# Altium PCB Kasli-DIOT.PCBDOC (part 4 of 23)
Units mm, origin at the board's own origin, x right, y up, seen from the top; angles counter-clockwise.
Board outline 222.9 x 100 mm, 10 copper layers (TopLayer, Layer 2, Layer 3, Layer 4, Layer 5, Layer 6, Layer 7, layer 8, Layer 9, BottomLayer), stack 1.564 mm thick; 977 components, 900 nets, 4676 pads, 2725 vias.
Unrouted connection lines stored in the file: 17.
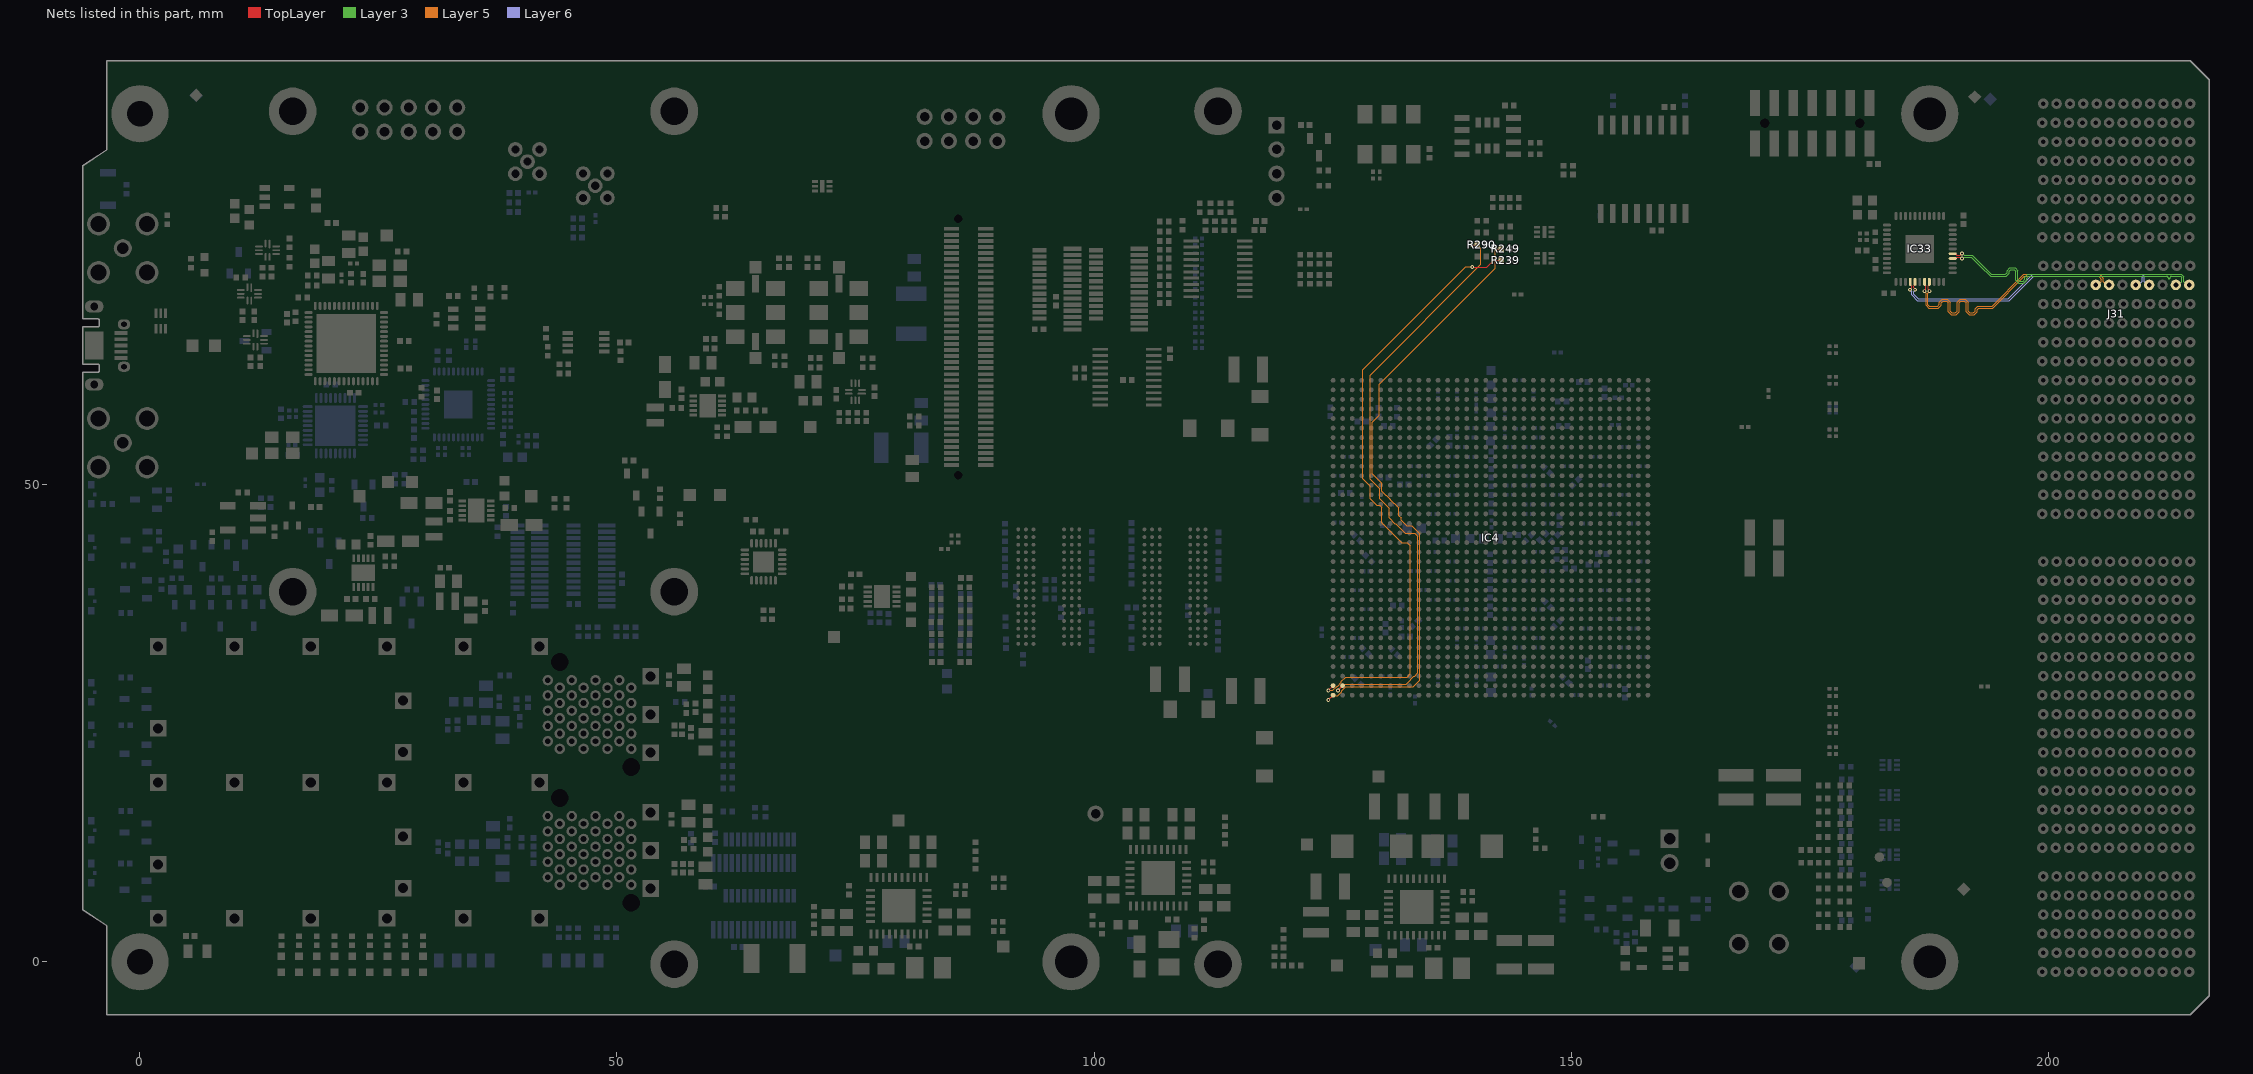
[diagram p12: the nets of this part, all layers, seen from the top]

## Footprints (in the part's own frame and the unit in brackets; to place one, negate y for a bottom-side part, rotate by r counter-clockwise, add the part's x,y. Pads: shape width x height; smd on the part's side, far side on the other; paste and mask are expansions set on the pad) (continued)
QFN50P600X600X90-37N-S425 [mm] "QFN, 0.50mm Pitch, Square; 36 Pin, 6.00mm L X 6.00mm W X 0.90mm H Body (w/thermal tab 4.25m x 4.25mm), IPC Medium Density"
  oval 1.05x0.3 smd: 1(-2.9,2) 2(-2.9,1.5) 3(-2.9,1) 4(-2.9,0.5) 5(-2.9,0) 6(-2.9,-0.5) 7(-2.9,-1) 8(-2.9,-1.5) 9(-2.9,-2) 19(2.9,-2) 20(2.9,-1.5) 21(2.9,-1) 22(2.9,-0.5) 23(2.9,0) 24(2.9,0.5) 25(2.9,1) 26(2.9,1.5) 27(2.9,2)
  oval 0.3x1.05 smd: 10(-2,-2.9) 11(-1.5,-2.9) 12(-1,-2.9) 13(-0.5,-2.9) 14(0,-2.9) 15(0.5,-2.9) 16(1,-2.9) 17(1.5,-2.9) 18(2,-2.9) 28(2,2.9) 29(1.5,2.9) 30(1,2.9) 31(0.5,2.9) 32(0,2.9) 33(-0.5,2.9) 34(-1,2.9) 35(-1.5,2.9) 36(-2,2.9)
  rect 4.25x4.25 smd: 37(0,0)
  silkscreen extent -4.01,-3 3,3, body extent -3,-3 3,3, height 0.9
QFN50P700X700X90-45N-S295 [mm] "QFN, 0.50mm Pitch, Square; 44 pin, 7.00mm L X 7.00mm W X 0.90mm H Body (w/Thermal Tab 2.95mm X 2.95mm), IPC Medium Density"
  oval 0.85x0.3 smd: 1(-3.45,2.5) 2(-3.45,2) 3(-3.45,1.5) 4(-3.45,1) 5(-3.45,0.5) 6(-3.45,0) 7(-3.45,-0.5) 8(-3.45,-1) 9(-3.45,-1.5) 10(-3.45,-2) 11(-3.45,-2.5) 23(3.45,-2.5) 24(3.45,-2) 25(3.45,-1.5) 26(3.45,-1) 27(3.45,-0.5) 28(3.45,0) 29(3.45,0.5) 30(3.45,1) 31(3.45,1.5) 32(3.45,2) 33(3.45,2.5)
  oval 0.3x0.85 smd: 12(-2.5,-3.45) 13(-2,-3.45) 14(-1.5,-3.45) 15(-1,-3.45) 16(-0.5,-3.45) 17(0,-3.45) 18(0.5,-3.45) 19(1,-3.45) 20(1.5,-3.45) 21(2,-3.45) 22(2.5,-3.45) 34(2.5,3.45) 35(2,3.45) 36(1.5,3.45) 37(1,3.45) 38(0.5,3.45) 39(0,3.45) 40(-0.5,3.45) 41(-1,3.45) 42(-1.5,3.45) 43(-2,3.45) 44(-2.5,3.45)
  rect 2.95x2.95 smd: 45(0,0)
  silkscreen extent -4.57,-3.5 3.5,3.5, body extent -3.5,-3.5 3.5,3.5, height 0.9
QFN50P800X800X100-57N-S620 [mm] "QFN, 0.50mm Pitch, Square; 56 Pin, 8.00mm L X 8.00mm W X 1.00mm H body (6.1mm X 6.1mm Thermal tab), IPC Medium Density"
  oval 0.85x0.3 smd: 1(-3.95,3.25) 2(-3.95,2.75) 3(-3.95,2.25) 4(-3.95,1.75) 5(-3.95,1.25) 6(-3.95,0.75) 7(-3.95,0.25) 8(-3.95,-0.25) 9(-3.95,-0.75) 10(-3.95,-1.25) 11(-3.95,-1.75) 12(-3.95,-2.25) 13(-3.95,-2.75) 14(-3.95,-3.25) 29(3.95,-3.25) 30(3.95,-2.75) 31(3.95,-2.25) 32(3.95,-1.75) 33(3.95,-1.25) 34(3.95,-0.75) 35(3.95,-0.25) 36(3.95,0.25) 37(3.95,0.75) 38(3.95,1.25) 39(3.95,1.75) 40(3.95,2.25) 41(3.95,2.75) 42(3.95,3.25)
  oval 0.3x0.85 smd: 15(-3.25,-3.95) 16(-2.75,-3.95) 17(-2.25,-3.95) 18(-1.75,-3.95) 19(-1.25,-3.95) 20(-0.75,-3.95) 21(-0.25,-3.95) 22(0.25,-3.95) 23(0.75,-3.95) 24(1.25,-3.95) 25(1.75,-3.95) 26(2.25,-3.95) 27(2.75,-3.95) 28(3.25,-3.95) 43(3.25,3.95) 44(2.75,3.95) 45(2.25,3.95) 46(1.75,3.95) 47(1.25,3.95) 48(0.75,3.95) 49(0.25,3.95) 50(-0.25,3.95) 51(-0.75,3.95) 52(-1.25,3.95) 53(-1.75,3.95) 54(-2.25,3.95) 55(-2.75,3.95) 56(-3.25,3.95)
  rect 6.2x6.2 smd: 57(0,0)
  silkscreen extent -5.07,-4 4,4, body extent -4,-4 4,4, height 1
RESC0603X28N [mm] "Chip Resistor, EIA 0201, Metric 0603, Body 0.6 x 0.3mm, IPC Medium Density"
  rect 0.46x0.42 smd: 1(-0.33,0) 2(0.33,0)
  body extent -0.32,-0.17 0.33,0.18, height 0.28
RESC1005X40N [mm] "Chip Resistor, EIA 0402, Metric 1005, Body 1.0x0.5mm, IPC Medium Density"
  rect 0.58x0.62 smd: 1(-0.47,0) 2(0.47,0)
  body extent -0.52,-0.27 0.53,0.28, height 0.4
RESC1608X55N [mm] "Chip Resistor, EIA 0603, Metric 1608, Body 1.6x0.8mm, IPC Medium Density"
  rect 0.9x1 smd: 1(-0.8,0) 2(0.8,0)
  body extent -0.87,-0.47 0.88,0.48, height 0.55
RESC2012X60N [mm] "Chip Resistor, EIA 0805, Metric 2012, Body 2.0x1.2mm, IPC Medium Density"
  rect 0.95x1.4 smd: 1(-1,0) 2(1,0)
  silkscreen extent 0,-0.55 0,0.55, body extent -1.1,-0.67 1.1,0.68, height 0.6
RESC2113X55N [mm] "Chip Resistor, EIA 0805, Metric 2113, Body 2.05x1.3mm, IPC Medium Density"
  rect 1x1.45 smd: 1(-0.95,0) 2(0.95,0)
  silkscreen extent 0,-0.55 0,0.55, body extent -1,-0.62 1,0.63, height 0.55
SAMTEC_HTSW-104-23-L-S [mm] "4 Contacts - Pitch 2.54mm - Single Row Through Mount Straigh Header (Post Lead 5.84mm, Tail Lead 2.92mm, Insulator 2.54mm)"
  rect 1.7x1.7 hole 1: 1(0,0)
  round 1.7 hole 1: 2(2.54,0) 3(5.08,0) 4(7.62,0)
  silkscreen extent -1.27,-1.27 8.89,2.01, body extent -1.27,-1.27 8.89,1.27, height 8.38
SAMTEC_LSS-140-01-L-DV-A [mm] "80 Contacts, Pitch 0.635mm, Razor Beam LSS Vertical High Speed Hermaphroditic Strip (Lead Style 4.5mm)"
  rect 0.4x1.6 smd: 1(12.383,-1.8) 2(12.383,1.8) 3(11.747,-1.8) 4(11.747,1.8) 5(11.112,-1.8) 6(11.112,1.8) 7(10.477,-1.8) 8(10.477,1.8) 9(9.842,-1.8) 10(9.842,1.8) 11(9.207,-1.8) 12(9.207,1.8) 13(8.572,-1.8) 14(8.572,1.8) 15(7.938,-1.8) 16(7.938,1.8) 17(7.302,-1.8) 18(7.302,1.8) 19(6.667,-1.8) 20(6.667,1.8) 21(6.032,-1.8) 22(6.032,1.8) 23(5.397,-1.8) 24(5.397,1.8) 25(4.763,-1.8) 26(4.763,1.8) 27(4.127,-1.8) 28(4.127,1.8) 29(3.492,-1.8) 30(3.492,1.8) 31(2.857,-1.8) 32(2.857,1.8) 33(2.222,-1.8) 34(2.222,1.8) 35(1.588,-1.8) 36(1.587,1.8) 37(0.953,-1.8) 38(0.952,1.8) 39(0.318,-1.8) 40(0.317,1.8) 41(-0.317,-1.8) 42(-0.318,1.8) 43(-0.952,-1.8) 44(-0.953,1.8) 45(-1.587,-1.8) 46(-1.588,1.8) 47(-2.222,-1.8) 48(-2.222,1.8) 49(-2.857,-1.8) 50(-2.857,1.8) 51(-3.492,-1.8) 52(-3.492,1.8) 53(-4.127,-1.8) 54(-4.127,1.8) 55(-4.763,-1.8) 56(-4.763,1.8) 57(-5.397,-1.8) 58(-5.397,1.8) 59(-6.032,-1.8) 60(-6.032,1.8) 61(-6.667,-1.8) 62(-6.667,1.8) 63(-7.302,-1.8) 64(-7.302,1.8) 65(-7.938,-1.8) 66(-7.938,1.8) 67(-8.572,-1.8) 68(-8.572,1.8) 69(-9.207,-1.8) 70(-9.207,1.8) 71(-9.842,-1.8) 72(-9.842,1.8) 73(-10.477,-1.8) 74(-10.477,1.8) 75(-11.112,-1.8) 76(-11.112,1.8) 77(-11.747,-1.8) 78(-11.747,1.8) 79(-12.383,-1.8) 80(-12.383,1.8)
  round 0.5 hole 0.9 unplated mask+0.2: P1(-13.45,1.1) P2(13.45,1.1)
  silkscreen extent -15.07,-2.83 15.07,2.14, body extent -15.07,-2.3 15.08,2.3, height 4.5
SAMTEC_MMCX-J-P-H-ST-TH1 [mm] "Straight Through-hole 50 Ohm Micro Mini RF Jack, MMCX Serie"
  round 1.55 hole 0.85: 1(0,0) 2(-1.27,1.27) 2(-1.27,-1.27) 2(1.27,1.27) 2(1.27,-1.27)
  silkscreen extent -1.75,-1.75 1.75,1.75, body extent -1.75,-1.75 1.75,1.75, height 4.35
SAMTEC_TSM-102-01-L-DV [mm] "2 Contacts, Pitch 2.54mm, Dual Row Surface Mount Straight Header (Post Lead 5.84mm)"
  rect 1.27x3.68 smd: 1(-1.27,-2.475) 2(-1.27,2.475) 3(1.27,-2.475) 4(1.27,2.475)
  silkscreen extent -2.54,-5.17 2.54,1.87, body extent -2.54,-3.85 2.54,3.85, height 9.65
SAMTEC_TSW-105-07-L-D-LL [mm] "10 Contacts, Pitch 2.54mm - Dual Row, Through Mount Straigh Header"
  round 1.7 hole 1: 1(-5.08,-1.27) 2(-5.08,1.27) 3(-2.54,-1.27) 4(-2.54,1.27) 5(0,-1.27) 6(0,1.27) 7(2.54,-1.27) 8(2.54,1.27) 9(5.08,-1.27) 10(5.08,1.27)
  silkscreen extent -6.35,-3.28 6.35,2.54, body extent -6.35,-2.54 6.35,2.54, height 8.38
SOD2512X110N [mm] "Small Outline Diode (SOD-323), 1.70mm W X 1.25mm L X 1.10mm H body,  IPC Medium Density"
  rect 0.9x0.5 smd: 1(-1.3,0) 2(1.3,0)
  silkscreen extent -1.62,-0.65 0.85,0.87, body extent -1.35,-0.67 1.35,0.68, height 1.1
SOIC127P600X175-8N [mm] "SOIC 8, Pitch 1.27mm - Body 4x5mm, IPC Medium Density"
  rect 1.55x0.6 smd: 1(-2.7,1.905) 2(-2.7,0.635) 3(-2.7,-0.635) 4(-2.7,-1.905) 5(2.7,-1.905) 6(2.7,-0.635) 7(2.7,0.635) 8(2.7,1.905)
  silkscreen extent -3.6,-2.5 1.55,2.87, body extent -3.1,-2.5 3.1,2.5, height 1.75
SOIC127P1030X265-16N [mm] "SOIC 16, Pitch 1.27mm - Body 7.5x10.3mm, IPC Medium Density"
  rect 2x0.6 smd: 1(-4.65,4.445) 2(-4.65,3.175) 3(-4.65,1.905) 4(-4.65,0.635) 5(-4.65,-0.635) 6(-4.65,-1.905) 7(-4.65,-3.175) 8(-4.65,-4.445) 9(4.65,-4.445) 10(4.65,-3.175) 11(4.65,-1.905) 12(4.65,-0.635) 13(4.65,0.635) 14(4.65,1.905) 15(4.65,3.175) 16(4.65,4.445)
  silkscreen extent -5.52,-5.15 3.32,5.38, body extent -5.18,-5.25 5.18,5.25, height 1.68
SON50P160X65_HS-7N [mm] "SON, 6-Leads, Body 1,60x1,60mm, Pitch 0,50mm, Thermal Pad 1,18x0,28mm, IPC Medium Density"
  rect 0.63x0.3 smd: 1(-0.76,0.5) 2(-0.76,0) 3(-0.76,-0.5) 4(0.76,-0.5) 5(0.76,0) 6(0.76,0.5)
  rect 0.45x1.3 smd: 7(0,0)
  silkscreen extent -1.27,-0.98 0.85,1.02, body extent -0.85,-0.85 0.85,0.85, height 0.65
SON50P300X300X80-11N-R175X248 [mm] "SON, 0.50mm Pitch, 10-pin, 3.00mm W  X 3.00mm L X 0.80mm Height, (w/thermal tab 1.75 X 2.48 mm), IPC Medium Density"
  rect 0.8x0.3 smd: 1(-1.5,1) 2(-1.5,0.5) 3(-1.5,0) 4(-1.5,-0.5) 5(-1.5,-1) 6(1.5,-1) 7(1.5,-0.5) 8(1.5,0) 9(1.5,0.5) 10(1.5,1)
  rect 1.75x2.48 smd: 11(0,0)
  silkscreen extent -1.67,1.63 -1.42,1.87, body extent -1.5,-1.5 1.5,1.5, height 0.8
SOP65P400X130-8N [mm] "SOP, 0.65mm, Pitch; 8 Pin, 2.80mm W X 2.95mm L X 1.30mm H Body, PC Medium Density"
  rect 1.1x0.4 smd: 1(-1.9,0.975) 2(-1.9,0.325) 3(-1.9,-0.325) 4(-1.9,-0.975) 5(1.9,-0.975) 6(1.9,-0.325) 7(1.9,0.325) 8(1.9,0.975)
  silkscreen extent -2.33,-1.5 1.02,1.82, body extent -2.15,-1.57 2.15,1.58, height 1.3
SOP65P640X110-24N [mm] "SOP, 24-Leads, Body 7.9x4.5mm (max), Pitch 0.65mm, IPC Medium Density"
  rect 1.45x0.45 smd: 1(-2.95,3.575) 2(-2.95,2.925) 3(-2.95,2.275) 4(-2.95,1.625) 5(-2.95,0.975) 6(-2.95,0.325) 7(-2.95,-0.325) 8(-2.95,-0.975) 9(-2.95,-1.625) 10(-2.95,-2.275) 11(-2.95,-2.925) 12(-2.95,-3.575) 13(2.95,-3.575) 14(2.95,-2.925) 15(2.95,-2.275) 16(2.95,-1.625) 17(2.95,-0.975) 18(2.95,-0.325) 19(2.95,0.325) 20(2.95,0.975) 21(2.95,1.625) 22(2.95,2.275) 23(2.95,2.925) 24(2.95,3.575)
  silkscreen extent -1.85,-4.18 1.85,3.95, body extent -3.12,-3.95 3.12,3.95, height 1.1
SOP65P780X200-28N [mm] "SOP, 0.65mm Pitch; 28 Pin, 5.30mm W X 10.20mm L X 2.00mm H Body, IPC Medium Density"
  rect 1.85x0.45 smd: 1(-3.5,4.225) 2(-3.5,3.575) 3(-3.5,2.925) 4(-3.5,2.275) 5(-3.5,1.625) 6(-3.5,0.975) 7(-3.5,0.325) 8(-3.5,-0.325) 9(-3.5,-0.975) 10(-3.5,-1.625) 11(-3.5,-2.275) 12(-3.5,-2.925) 13(-3.5,-3.575) 14(-3.5,-4.225) 15(3.5,-4.225) 16(3.5,-3.575) 17(3.5,-2.925) 18(3.5,-2.275) 19(3.5,-1.625) 20(3.5,-0.975) 21(3.5,-0.325) 22(3.5,0.325) 23(3.5,0.975) 24(3.5,1.625) 25(3.5,2.275) 26(3.5,2.925) 27(3.5,3.575) 28(3.5,4.225)
  silkscreen extent -4.27,-5.45 2.25,5.1, body extent -4.11,-5.25 4.11,5.25, height 2
SOT65P210X110-3N [mm] "SOT323, 0.65mm pitch; 3 pin, 1.25mm W X 2.00mm L, IPC Medium Density"
  rect 0.85x0.55 smd: 1(-1.05,0.65) 2(-1.05,-0.65) 3(1.05,0)
  silkscreen extent -0.3,-1 0.3,1, body extent -1.1,-1.1 1.1,1.1, height 1.1
SOT95P230X110-3N [mm] "SOT23, 3 pin, Pitch 0.95mm - 1.3mm W X 2.9mm L X 1.1mm H, IPC Medium Density"
  rect 1x0.6 smd: 1(-1.15,0.95) 2(-1.15,-0.95) 3(1.15,0)
  silkscreen extent -1.52,-1.45 0.33,1.87, body extent -1.08,-1.5 1.25,1.5, height 1.1
SOT95P240X110-3N [mm] "SOT23 3-Leads, Pitch 0.95mm, Body 1.3x2.9mm, IPC Medium Density"
  rect 1.05x0.65 smd: 1(-1.15,0.95) 2(-1.15,-0.95) 3(1.15,0)
  silkscreen extent -1.53,-1.45 0.3,1.92, body extent -1.25,-1.5 1.25,1.5, height 1.1
SOT95P270X145-6N [mm] "SOT, 0.95mm Pitch; 6 Pin,1.55mm W X 2.90mm L X 1.45mm H body, IPC Medium Density"
  rect 1.1x0.6 smd: 1(-1.4,0.95) 2(-1.4,0) 3(-1.4,-0.95) 4(1.4,-0.95) 5(1.4,0) 6(1.4,0.95)
  silkscreen extent -1.82,-1.45 0.45,1.71, body extent -1.35,-1.45 1.35,1.45, height 1.45
SOT95P280X100-5N [mm] "SOT23, 0.95mm pitch; 5 pin, 1.625mm W X 2.9mm L, IPC Medium Density"
  rect 1.1x0.55 smd: 1(-1.35,0.95) 2(-1.35,0) 3(-1.35,-0.95) 4(1.35,-0.95) 5(1.35,0.95)
  silkscreen extent -1.78,-1.45 0.48,1.87, body extent -1.4,-1.5 1.4,1.5, height 1
SOT95P280X145-5N [mm] "SOT, 0.95mm pitch; 5 pin, 1.60mm W X 2.90mm L X 1.45mm H body, IPC Medium Density"
  rect 1.1x0.6 smd: 1(-1.3,0.95) 2(-1.3,0) 3(-1.3,-0.95) 4(1.3,-0.95) 5(1.3,0.95)
  silkscreen extent -1.72,-1.45 0.43,1.87, body extent -1.4,-1.5 1.4,1.5, height 1.45
SOT95P280X145-6N [mm] "SOT23, 6-Leads, Body 1.6x3.0mm, Pitch 0.95mm, IPC Medium Density"
  rect 1.05x0.6 smd: 1(-1.35,0.95) 2(-1.35,0) 3(-1.35,-0.95) 4(1.35,-0.95) 5(1.35,0) 6(1.35,0.95)
  silkscreen extent -2.45,-1.55 0.45,1.55, body extent -1.4,-1.5 1.4,1.5, height 1.45
SOT-23-TT3_L [mm] "SOT23, 3-Leads, Body 2.9x1.3mm, Pitch 0.95mm, Lead Span 2.4mm, IPC High Density"
  rect 1.2x0.6 smd: 1(-0.9,0.95) 2(-0.9,-0.95) 3(0.9,0)
  silkscreen extent -1.02,-1.55 0.7,1.93, body extent -0.7,-1.52 0.7,1.53, height 1.12
SW_OMRON_B3U-3000PM [mm] "Body 3.2x4.0mm, SPST Surface-Mounting Tactile Switch with Side Actuator (B3U Series)"
  rect 0.8x1.7 smd: 1(-1.7,0) 2(1.7,0)
  silkscreen extent -2.82,-1.57 1.5,1.22, body extent -2,-1.95 2,1.25, height 1.2
"TEXAS_DRC (S-PVSON-N10)" [mm] "SON, TEXAS DRC (S-PVSON-N10), 0.50mm Pitch, 10-pin, 3.00mm W  X 3.00mm L X 1.00mm Height, (w/thermal tab 1.65 X 2.40 mm)"
  rect 0.85x0.3 smd: 1(-1.5,1) 2(-1.5,0.5) 3(-1.5,0) 4(-1.5,-0.5) 5(-1.5,-1) 6(1.5,-1) 7(1.5,-0.5) 8(1.5,0) 9(1.5,0.5) 10(1.5,1)
  rect 1.65x2.4 smd: 11(0,0)
  TopLayer region: -0.825,1.2 -0.39,1.2 -0.39,1.9 -0.11,1.9 -0.11,1.2 0.11,1.2 0.11,1.9 0.39,1.9 0.39,1.2 0.825,1.2 0.825,-1.2 0.39,-1.2 0.39,-1.9 0.11,-1.9 0.11,-1.2 -0.11,-1.2 -0.11,-1.9 -0.39,-1.9 -0.39,-1.2 -0.825,-1.2
  body extent -1.57,-1.57 1.58,1.58, height 1
TPS127 [mm] "1.27 x  1.27mm SMD Test Point Area"
  rect 1.27x1.27 smd paste-1.27: 1(0,0)
  silkscreen extent -0.94,-0.94 0.94,0.94
USBLC6-2P6 [mm]
  rect 0.3x0.99 smd: 1(-0.5,-0.78) 2(0,-0.78) 3(0.5,-0.78) 4(0.5,0.83) 5(0,0.83) 6(-0.5,0.83)
  silkscreen extent -0.6,-1.62 -0.5,-1.53, body extent -0.75,-0.72 0.75,0.78, height 0.46
XFMR_MINI-CIRCUITS_AT1521 [mm] "MINI-CIRCUITS RF Transformer, Case AT1521, Body 3.81X3.81mm"
  rect 0.76x1.65 smd: 1(-1.27,1.59) 2(0,1.59) 3(1.27,1.59) 4(1.27,-1.59) 6(-1.27,-1.59)
  silkscreen extent -2.3,-0.37 1.91,1.72, body extent -1.9,-1.9 1.91,1.91, height 4.06
XTAL_CONNOR_CS [mm] "4 Pins, 2.5x3.2mm, SMD Sealing Crystal, CS Serie"
  rect 1.2x1.4 smd: 1(-0.85,1.1) 2(-0.85,-1.1) 3(0.85,-1.1) 4(0.85,1.1)
  silkscreen extent -2.12,1.08 -1.88,1.33, body extent -1.25,-1.6 1.25,1.6, height 0.8
XTAL_TXC_7M [mm] "4 Pins, 2.5x3.2mm, SMD Sealing Crystal, 7M Serie"
  rect 1.2x1.4 smd: 1(-0.85,1.1) 2(-0.85,-1.1) 3(0.85,-1.1) 4(0.85,1.1)
  silkscreen extent -1.62,2.18 -1.37,2.43, body extent -1.25,-1.6 1.25,1.6, height 0.8

## Part data
B28 B29: library part SMD_PAD_D1MM, "Through Hole Pad", Author="CERN DEM JLC", Component Type="Standard (No BOM)", ComponentHeight=0mm, CreateDate=10.10.2017, Family="SMD Pad", HelpURL=Undefined, LatestRevisionDate=10.10.2017, Mounted=No, PackageDescription="1mm Diameter SMD Pad", Part Description="1mm Diameter SMD Pad", Part Number=SMD_PAD_D1MM, Pin Count=1, Sense=No, SMD=No, Socket=No, Status=None
C1 C2 C4 C5 C6 C7 C8 C10 C11 C14 C20 C21 C25 C26 C41 C51 C54 C63 C70 C71 C72 C73 C74 C77 C100 C112 C113 C114 C115 C116 C120 C122 C141 C142 C157 C159 C188 C189 C200 C201 C203 C210 C212 C228 C229 C230 C231 C232 C233 C236 C237 C245 C246 C247 C258 C295 C297 C300 C323 C324 C325 C326 C327 C334 C335 C336 C337 C338 C341 C342 C343 C344 C345 C354 C392 C393 C394 C395 C399 C400 C401 C402 C403 C405 C410 C411 C413 C414 C415 C416 C417 C418 C421 C422 C434 C435 C436 C437 C438 C439 C440 C441 C442 C443 C444 C445 C446 C447 C448 C449 C450 C479: library part CC0201_100NF_6.3V_10%_X5R, "Non-polarised capacitor", Case=0201, Manufacturer=GENERIC, Manufacturer1 ComponentHeight=0.33mm, Manufacturer1 Example=AVX, Manufacturer1 Part Number=02016D104KAT2A, Tolerance=±10%, Voltage=6.3V, Author="CERN DEM JLC", Component Type=Standard, HelpURL=\\cern.ch\dfs\Applications\Altium\Datasheets\CC0201_X5R_AVX.pdf, Manufacturer Part Number=CC0201_100NF_6.3V_10%_X5R, Mounted=Yes, Part Description="SMD Multilayer Chip Ceramic Capacitor", Part Number=CC0201_100NF_6.3V_10%_X5R, Pin Count=2, Sense=No, SMD=Yes, Socket=No, Status="Not Recommended", TC=X5R
  C1 C2 C4 C6 C7 C8 C10 C11 C20 C21 C25 C26 C41 C54 C77 C100 C141 C157 C188 C189 C200 C201 C203 C228 C236 C237 C245 C246 C247 C295 C297 C300 C392 C393 C394 C395 C403 C405 C413 C414 C415 C416 C417 C418 C422: CreateDate=2007-12-03, LatestRevisionDate=2007-12-03
  C5 C14 C63 C70 C71 C72 C73 C74 C142 C210 C212 C229 C230 C231 C232 C233 C258 C399 C400 C401 C402 C410 C411 C421 C434 C435 C436 C437 C438 C439 C440 C441 C442 C443 C444 C445 C446 C447 C448 C449 C450 C479: CreateDate=03.12.2007, LatestRevisionDate=03.12.2007
  C51 C112 C113 C114 C115 C116 C120 C122 C323 C324 C325 C326 C327 C334 C335 C336 C337 C338 C341 C342 C343 C344 C345 C354: ClassName=Artix, CreateDate=2007-12-03, LatestRevisionDate=2007-12-03
  C159: ClassName=FPGA_JTAG, CreateDate=2007-12-03, LatestRevisionDate=2007-12-03
C3 C18 C22 C27 C40 C42 C48 C130 C131 C132 C133 C137 C144 C194 C195 C299 C301 C302 C303 C304 C381 C383 C384 C385 C386 C387 C388 C389 C390 C423 C424 C425: library part CC0805_22UF_16V_10%_X5R, "Non-polarised capacitor", Case=0805, Manufacturer=GENERIC, Manufacturer1 ComponentHeight=1.35mm, Manufacturer1 Example=TDK, Manufacturer1 Part Number=C2012X5R1C226KT, Tolerance=±10%, Voltage=16V, Author="CERN DEM JLC", Component Type=Standard, CreateDate=25.10.2012, HelpURL=\\cern.ch\dfs\Applications\Altium\Datasheets\CC0805_X5R_TDK_C.pdf, LatestRevisionDate=25.10.2012, Manufacturer Part Number=CC0805_22UF_16V_10%_X5R, Mounted=Yes, Part Description="SMD Multilayer Chip Ceramic Capacitor", Part Number=CC0805_22UF_16V_10%_X5R, Pin Count=2, Sense=No, SMD=Yes, Socket=No, Status=Preferred, TC=X5R
C9 C13 C19 C45 C225 C286: library part CTE3216-18_22UF_6.3V_10%_LESR0900, "Polarised capacitor", Case=A, Manufacturer=GENERIC, Manufacturer1 ComponentHeight=1.8mm, Manufacturer1 Example=AVX, Manufacturer1 Part Number=TPSA226K006R0900, Tolerance=±10%, Voltage=6.3V, Author="CERN DEM JLC", Component Type=Standard, CreateDate=05.05.2008, HelpURL=\\cern.ch\dfs\Applications\Altium\Datasheets\CTE-LESR_AVX_TPS.pdf, LatestRevisionDate=20.01.2009, Manufacturer Part Number=CTE3216-18_22UF_6.3V_10%_LESR0900, Mounted=Yes, Part Description="Low ESR 0R9 Solid Tantalum Chip Capacitor", Part Number=CTE3216-18_22UF_6.3V_10%_LESR0900, Pin Count=2, Sense=No, SMD=Yes, Socket=No, Status=Preferred
C12 C15 C170 C278 C292 C454 C471 C472 C473: library part CC0402_4.7UF_6.3V_20%_X5R, "Non-polarised capacitor", Case=0402, Manufacturer=GENERIC, Manufacturer1 ComponentHeight=0.65mm, Manufacturer1 Example=TDK, Manufacturer1 Part Number=C1005X5R0J475M050BC, Tolerance=±20%, Voltage=6.3V, Author="CERN DEM JLC", Component Type=Standard, HelpURL=\\cern.ch\dfs\Applications\Altium\Datasheets\CC0402_X5R_TDK_C.pdf, Manufacturer Part Number=CC0402_4.7UF_6.3V_20%_X5R, Mounted=Yes, Part Description="SMD Multilayer Chip Ceramic Capacitor", Part Number=CC0402_4.7UF_6.3V_20%_X5R, Pin Count=2, Sense=No, SMD=Yes, Socket=No, Status=Preferred, TC=X5R
  C12 C15 C278: CreateDate=03.03.2015, LatestRevisionDate=03.03.2015
  C170 C292 C454 C471 C472 C473: CreateDate=03/03/2015, LatestRevisionDate=03/03/2015
C16 C17 C279: library part CC0603_22UF_6.3V_20%_X5R, "Non-polarised capacitor", Case=0603, Manufacturer=GENERIC, Manufacturer1 ComponentHeight=1mm, Manufacturer1 Example=TDK, Manufacturer1 Part Number=C1608X5R0J226M080, Tolerance=±20%, Voltage=6.3V, Author="CERN DEM JLC", Component Type=Standard, CreateDate=16.12.2013, HelpURL=\\cern.ch\dfs\Applications\Altium\Datasheets\CC0603_X5R_TDK_C.pdf, LatestRevisionDate=13.09.2016, Manufacturer Part Number=CC0603_22UF_6.3V_20%_X5R, Mounted=Yes, Part Description="SMD Multilayer Chip Ceramic Capacitor", Part Number=CC0603_22UF_6.3V_20%_X5R, Pin Count=2, Sense=No, SMD=Yes, Socket=No, Status=None, TC=X5R
C23 C226 C287 C290 C291: library part CC0402_1NF_50V_10%_X7R, "Non-polarised capacitor", Case=0402, Manufacturer=GENERIC, Manufacturer1 ComponentHeight=0.55mm, Manufacturer1 Example=PHYCOMP, Manufacturer1 Part Number=223858715623, Tolerance=±10%, Voltage=50V, Author="CERN DEM JLC", Component Type=Standard, CreateDate=03.12.2007, HelpURL=\\cern.ch\dfs\Applications\Altium\Datasheets\CC0402_X7R_PHYCOMP.pdf, LatestRevisionDate=03.12.2007, Manufacturer Part Number=CC0402_1NF_50V_10%_X7R, Mounted=Yes, Part Description="SMD Multilayer Chip Ceramic Capacitor", Part Number=CC0402_1NF_50V_10%_X7R, Pin Count=2, Sense=No, SMD=Yes, Socket=No, Status="Not Recommended", TC=X7R
C24 C172 C178 C180 C190 C244 C259 C261 C267 C269 C275: library part CC0402_1UF_16V_10%_X5R, "Non-polarised capacitor", Case=0402, Manufacturer=GENERIC, Manufacturer1 ComponentHeight=0.55mm, Manufacturer1 Example=TDK, Manufacturer1 Part Number=C1005X5R1C105KT, Tolerance=±10%, Voltage=16V, Author="CERN DEM JLC", Component Type=Standard, HelpURL=\\cern.ch\dfs\Applications\Altium\Datasheets\CC0402_X5R_TDK_C.pdf, Manufacturer Part Number=CC0402_1UF_16V_10%_X5R, Mounted=Yes, Part Description="SMD Multilayer Chip Ceramic Capacitor", Part Number=CC0402_1UF_16V_10%_X5R, Pin Count=2, Sense=No, SMD=Yes, Socket=No, Status=Preferred, TC=X5R
  C24 C178 C180 C190 C244 C259 C261 C267 C269 C275: CreateDate=2012-10-25, LatestRevisionDate=2012-10-25
  C172: CreateDate=25.10.2012, LatestRevisionDate=25.10.2012
C28 C29 C36 C38 C49 C52 C53 C160 C161 C162 C163 C168 C169 C177 C181 C182 C183 C185 C186 C191 C192 C193 C196 C197 C198 C199 C204 C213 C214 C215 C216 C217 C218 C219 C220 C221 C222 C223 C224 C227 C234 C239 C241 C262 C263 C265 C266 C270 C271 C273 C276 C277 C281 C293 C296 C298 C305 C306 C366 C367 C397 C404 C407 C408 C409 C412 C427 C452 C453 C457 C458 C461 C467 C474 C475 C476 C477 C478: library part CC0402_100NF_16V_10%_X7R, "Non-polarised capacitor", Case=0402, Manufacturer=GENERIC, Manufacturer1 ComponentHeight=0.55mm, Manufacturer1 Example=MURATA, Manufacturer1 Part Number=GRM155R71C104KA88D, Tolerance=±10%, Voltage=16V, Author="CERN DEM JLC", Component Type=Standard, CreateDate=05/12/2013, HelpURL=\\cern.ch\dfs\Applications\Altium\Datasheets\CC0402_X7R_MURATA_GRM.pdf, LatestRevisionDate=03/12/2007, Manufacturer Part Number=CC0402_100NF_16V_10%_X7R, Mounted=Yes, Part Description="SMD Multilayer Chip Ceramic Capacitor", Part Number=CC0402_100NF_16V_10%_X7R, Pin Count=2, Sense=No, SMD=Yes, Socket=No, Status="Not Recommended", TC=X7R
C30 C362 C363: library part CTE3528-21_33UF_16V_10%, "Polarised capacitor", Case=B, Manufacturer=GENERIC, Manufacturer1 ComponentHeight=2.1mm, Manufacturer1 Example=AVX, Manufacturer1 Part Number=TAJB336K016R, Tolerance=±10%, Voltage=16V, Author="CERN DEM JLC", Component Type=Standard, CreateDate=03.12.2007, HelpURL=\\cern.ch\dfs\Applications\Altium\Datasheets\CTE_AVX_TAJ.pdf, LatestRevisionDate=03.12.2007, Manufacturer Part Number=CTE3528-21_33UF_16V_10%, Mounted=Yes, Part Description="Solid Tantalum Chip Capacitor", Part Number=CTE3528-21_33UF_16V_10%, Pin Count=2, Sense=No, SMD=Yes, Socket=No, Status=Preferred
C31 C33 C34 C35 C37 C39 C57 C58 C59 C66 C67 C78 C79 C85 C86 C92 C93 C94 C96 C109 C110 C111 C123 C124 C134 C135 C143 C145 C151 C152 C158 C240 C313 C314 C352 C355 C356 C357 C358 C361 C428 C429 C480 C481: library part CC0402_4.7UF_6.3V_20%_X5R, "Non-polarised capacitor", Case=0402, Manufacturer=GENERIC, Manufacturer1 ComponentHeight=0.65mm, Manufacturer1 Example=TDK, Manufacturer1 Part Number=C1005X5R0J475M050, Tolerance=±20%, Voltage=6.3V, Author="CERN DEM JLC", Component Type=Standard, CreateDate=03.03.2015, HelpURL=\\cern.ch\dfs\Applications\Altium\Datasheets\CC0402_X5R_TDK_C.pdf, LatestRevisionDate=03.03.2015, Manufacturer Part Number=CC0402_4.7UF_6.3V_20%_X5R, Mounted=Yes, Part Description="SMD Multilayer Chip Ceramic Capacitor", Part Number=CC0402_4.7UF_6.3V_20%_X5R, Pin Count=2, Sense=No, SMD=Yes, Socket=No, Status=Preferred, TC=X5R
C32 C364 C365: library part CTE3216-18_10UF_16V_20%_AVX_TCJ, "Polarised capacitor", Case=A, Manufacturer=AVX, Manufacturer Part Number=TCJA106M016R0200, Tolerance=±20%, Voltage=16V, Author="CERN DEM JLC", Component Type=Standard, ComponentHeight=1.8mm, CreateDate=29.03.2012, HelpURL=\\cern.ch\dfs\Applications\Altium\Datasheets\CTE_AVX_TCJ.pdf, LatestRevisionDate=29.03.2012, Mounted=Yes, Part Description="ESR 0R200 Tantalum Solid Electrolytic Chip Capacitor with Conductive Polymer Electrode", Part Number=CTE3216-18_10UF_16V_20%_AVX_TCJ, Pin Count=2, Sense=No, SMD=Yes, Socket=No, Status=Preferred
C43 C44 C46 C47 C164 C165 C166 C167 C175 C238 C462 C463 C464 C468 C469 C470: library part CC0402_10NF_16V_10%_X7R, "Non-polarised capacitor", Case=0402, Manufacturer=GENERIC, Manufacturer1 ComponentHeight=0.55mm, Manufacturer1 Example=PHYCOMP, Manufacturer1 Part Number=223878715636, Tolerance=±10%, Voltage=16V, Author="CERN DEM JLC", Component Type=Standard, CreateDate=03.12.2007, HelpURL=\\cern.ch\dfs\Applications\Altium\Datasheets\CC0402_X7R_PHYCOMP.pdf, LatestRevisionDate=03.12.2007, Manufacturer Part Number=CC0402_10NF_16V_10%_X7R, Mounted=Yes, Part Description="SMD Multilayer Chip Ceramic Capacitor", Part Number=CC0402_10NF_16V_10%_X7R, Pin Count=2, Sense=No, SMD=Yes, Socket=No, Status="Not Recommended", TC=X7R
C50 C319 C320 C321 C332 C339: library part CC0603_22UF_6.3V_20%_X5R, "Non-polarised capacitor", Case=0603, Manufacturer=GENERIC, Manufacturer1 ComponentHeight=0.9mm, Manufacturer1 Example=TDK, Manufacturer1 Part Number=C1608X5R0J226M080, Tolerance=±20%, Voltage=6.3V, Author="CERN DEM JLC", Component Type=Standard, CreateDate=16.12.2013, HelpURL=\\cern.ch\dfs\Applications\Altium\Datasheets\CC0603_X5R_TDK_C.pdf, LatestRevisionDate=03.12.2020, Manufacturer Part Number=CC0603_22UF_6.3V_20%_X5R, Mounted=Yes, Part Description="SMD Multilayer Chip Ceramic Capacitor", Part Number=CC0603_22UF_6.3V_20%_X5R, Pin Count=2, Sense=No, SMD=Yes, Socket=No, Status=None, TC=X5R
C55 C60 C61 C62 C64 C68 C69 C75 C76 C80 C81 C82 C83 C87 C88 C89 C90 C95 C97 C98 C99 C102 C103 C104 C105 C106 C107 C108 C117 C118 C119 C121 C125 C126 C127 C128 C136 C138 C139 C140 C146 C147 C148 C149 C153 C154 C155 C156 C242 C308 C309 C310 C311 C315 C316 C317 C318 C322 C333 C340 C353 C368 C369 C370 C371 C372 C373 C374 C375 C376 C377 C378 C379 C380 C430 C431 C432 C433 C482 C483 C484 C485: library part CC0201_470NF_4V_20%_X5R, "Non-polarised capacitor", Case=0201, Manufacturer=GENERIC, Manufacturer1 ComponentHeight=0.33mm, Manufacturer1 Example="TAIYO YUDEN", Manufacturer1 Part Number=AMK063BJ474MP-F, Tolerance=±20%, Voltage=4V, Author="CERN DEM JLC", Component Type=Standard, CreateDate=27.05.2010, HelpURL=\\cern.ch\dfs\Applications\Altium\Datasheets\CC0201_X5R_TAIYO-YUDEN_STANDARD-CLASS2.pdf, LatestRevisionDate=27.05.2010, Manufacturer Part Number=CC0201_470NF_4V_20%_X5R, Mounted=Yes, Part Description="SMD Multilayer Chip Ceramic Capacitor", Part Number=CC0201_470NF_4V_20%_X5R, Pin Count=2, Sense=No, SMD=Yes, Socket=No, Status="Not Recommended", TC=X5R
  C61 C69 C81 C88 C95 C97 C98 C99 C126 C138 C147 C154 C309 C316 C322 C333 C340 C353 C370 C376 C431 C483: ClassName=Artix
C56 C65 C84 C129 C150 C312 C351 C359 C360: library part CC1210_100UF_6.3V_20%_X5R, "Non-polarised capacitor", Case=1210, Manufacturer=GENERIC, Manufacturer1 ComponentHeight=2.7mm, Manufacturer1 Example=MURATA, Manufacturer1 Part Number=GRM32ER60J107ME20L, Tolerance=±20%, Voltage=6.3V, Author="CERN DEM JLC", Component Type=Standard, CreateDate=19.04.2010, HelpURL=\\cern.ch\dfs\Applications\Altium\Datasheets\CC1210_X5R_MURATA.pdf, LatestRevisionDate=19.04.2010, Manufacturer Part Number=CC1210_100UF_6.3V_20%_X5R, Mounted=Yes, Part Description="SMD Multilayer Chip Ceramic Capacitor", Part Number=CC1210_100UF_6.3V_20%_X5R, Pin Count=2, Sense=No, SMD=Yes, Socket=No, Status=Preferred, TC=X5R
C91 C346: library part CTE7343-19_330UF_2.5V_20%_LESR0025_KEMET_T520, "Polarised capacitor", Case=V, Manufacturer=KEMET, Manufacturer Part Number=T520V337M2R5ATE025, Tolerance=±20%, Voltage=2.5V, Author="CERN DEM MR", ComponentHeight=1.9mm, Component Type=Standard, CreateDate=23.03.2016, HelpURL=\\cern.ch\dfs\Applications\Altium\Datasheets\CTE-LESR_KEMET_T520.pdf, LatestRevisionDate=23.03.2016, Mounted=Yes, Part Description="Low ESR 0R025 Tantalum Chip Capacitor", Part Number=CTE7343-19_330UF_2.5V_20%_LESR0025_KEMET_T520, Pin Count=2, Sense=No, SMD=Yes, Socket=No, Status=None
C101 C173 C174 C176 C205: library part CC0603_22UF_6.3V_20%_X5R, "Non-polarised capacitor", Case=0603, Manufacturer=GENERIC, Manufacturer1 ComponentHeight=1mm, Manufacturer1 Example=TDK, Manufacturer1 Part Number=C1608X5R0J226M080AC, Tolerance=±20%, Voltage=6.3V, Author="CERN DEM JLC", Component Type=Standard, CreateDate=16.12.2013, HelpURL=\\cern.ch\dfs\Applications\Altium\Datasheets\CC0603_X5R_TDK_C.pdf, LatestRevisionDate=13.09.2016, Manufacturer Part Number=CC0603_22UF_6.3V_20%_X5R, Mounted=Yes, Part Description="SMD Multilayer Chip Ceramic Capacitor", Part Number=CC0603_22UF_6.3V_20%_X5R, Pin Count=2, Sense=No, SMD=Yes, Socket=No, Status=None, TC=X5R
  C101 C205: ClassName=Artix
C171 C451 C455 C456 C459 C460 C465 C466: library part CC0402_470NF_16V_10%_X5R, "Non-polarised capacitor", Case=0402, Manufacturer=GENERIC, Manufacturer1 ComponentHeight=0.55mm, Manufacturer1 Example=TDK, Manufacturer1 Part Number=C1005X5R1C105KT, Tolerance=±10%, Voltage=16V, Author="CERN DEM JLC", Component Type=Standard, CreateDate=10/25/2012, HelpURL=\\cern.ch\dfs\Applications\Altium\Datasheets\CC0402_X5R_TDK_C.pdf, LatestRevisionDate=10/25/2012, Manufacturer Part Number=CC0402_470NF_16V_10%_X5R, Mounted=Yes, Part Description="SMD Multilayer Chip Ceramic Capacitor", Part Number=CC0402_470NF_16V_10%_X5R, Pin Count=2, Sense=No, SMD=Yes, Socket=No, Status=Preferred, TC=X5R
C179 C184 C260 C264 C268 C272 C274 C280: library part CC0805_10UF_25V_10%_X5R, "Non-polarised capacitor", Case=0805, Manufacturer=GENERIC, Manufacturer1 ComponentHeight=0.95mm, Manufacturer1 Example=MURATA, Manufacturer1 Part Number=GRM219R61E106KA12D, Tolerance=±10%, Voltage=25V, Author="CERN DEM JLC", Component Type=Standard, CreateDate=25.10.2012, HelpURL=\\cern.ch\dfs\Applications\Altium\Datasheets\CC0805_X5R_MURATA_GRM.pdf, LatestRevisionDate=06.09.2016, Manufacturer Part Number=CC0805_10UF_25V_10%_X5R, Mounted=Yes, Part Description="SMD Multilayer Chip Ceramic Capacitor", Part Number=CC0805_10UF_25V_10%_X5R, Pin Count=2, Sense=No, SMD=Yes, Socket=No, Status=Preferred, TC=X5R
C187 C382 C391 C406 C419 C420: library part CC0603_1UF_25V_10%_X7R, "Non-polarised capacitor", Case=0603, Manufacturer=GENERIC, Manufacturer1 ComponentHeight=0.9mm, Manufacturer1 Example=MURATA, Manufacturer1 Part Number=GRM188R71E105KA12D, Tolerance=±10%, Voltage=25V, Author="CERN DEM JLC", Component Type=Standard, CreateDate=18.01.2011, HelpURL=\\cern.ch\dfs\Applications\Altium\Datasheets\CC0603_X7R_MURATA.pdf, LatestRevisionDate=18.01.2011, Manufacturer Part Number=CC0603_1UF_25V_10%_X7R, Mounted=Yes, Part Description="SMD Multilayer Chip Ceramic Capacitor", Part Number=CC0603_1UF_25V_10%_X7R, Pin Count=2, Sense=No, SMD=Yes, Socket=No, Status=None, TC=X7R
C202: library part CC0603_10UF_6.3V_20%_X5R, "Non-polarised capacitor", Case=0603, Manufacturer=GENERIC, Manufacturer1 ComponentHeight=0.95mm, Manufacturer1 Example=KEMET, Manufacturer1 Part Number=C0603C106M9PAC, Manufacturer Part Number=CC0603_10uF_6.3V_20%_X5R, Tolerance=±20%, Voltage=6.3V, Author="CERN DEM JLC", Component Type=Standard, CreateDate=2007-12-03, HelpURL=\\cern.ch\dfs\Applications\Altium\Datasheets\CC0603_X5R_KEMET.pdf, LatestRevisionDate=2007-12-03, Mounted=Yes, Part Description="SMD Multilayer Chip Ceramic Capacitor", Part Number=CC0603_10UF_6.3V_20%_X5R, Pin Count=2, Sense=No, SMD=Yes, Socket=No, Status=Preferred, TC=X5R
C206 C209 C211 C288 C289: library part CC0805_4.7UF_10V_10%_X5R, "Non-polarised capacitor", Case=0805, Manufacturer=GENERIC, Manufacturer1 ComponentHeight=1.45mm, Manufacturer1 Example=PHYCOMP, Manufacturer1 Part Number=222224013672, Tolerance=±10%, Voltage=10V, Author="CERN DEM JLC", Component Type=Standard, CreateDate=03.12.2007, HelpURL=\\cern.ch\dfs\Applications\Altium\Datasheets\CC0805_X5R_PHYCOMP_HC.pdf, LatestRevisionDate=03.12.2007, Manufacturer Part Number=CC0805_4.7UF_10V_10%_X5R, Mounted=Yes, Part Description="SMD Multilayer Chip Ceramic Capacitor", Part Number=CC0805_4.7UF_10V_10%_X5R, Pin Count=2, Sense=No, SMD=Yes, Socket=No, Status=Preferred, TC=X5R
C207 C208 C243: library part CC0402_22PF_50V_5%_C0G, "Non-polarised capacitor", Case=0402, Manufacturer=GENERIC, Manufacturer1 ComponentHeight=0.55mm, Manufacturer1 Example=KEMET, Manufacturer1 Part Number=C0402C220J5GACTU, Tolerance=±5%, Voltage=50V, Author="CERN DEM JLC", Component Type=Standard, HelpURL="\\cern.ch\dfs\Applications\Altium\Datasheets\CC0805_C0G_KEMET_(Commercial Grade).pdf", Manufacturer Part Number=CC0402_22PF_50V_5%_C0G, Mounted=Yes, Part Description="SMD Multilayer Chip Ceramic Capacitor", Part Number=CC0402_22PF_50V_5%_C0G, Pin Count=2, Sense=No, SMD=Yes, Socket=No, Status=Preferred, TC=C0G/NP0
  C207 C208: CreateDate=03.12.2007, LatestRevisionDate=03.12.2007
  C243: CreateDate=2007-12-03, LatestRevisionDate=2007-12-03
C235: library part CC1210_47UF_10V_10%_X7R, "Non-polarised capacitor", Case=1210, Manufacturer=GENERIC, Manufacturer1 ComponentHeight=2.7mm, Manufacturer1 Example=MURATA, Manufacturer1 Part Number=GRM32ER71A476KE15, Tolerance=±10%, Voltage=10V, Author="CERN DEM BC", Component Type=Standard, CreateDate=18.11.2015, HelpURL=\\cern.ch\dfs\Applications\Altium\Datasheets\CC1210_X7R_MURATA.pdf, LatestRevisionDate=18.11.2015, Manufacturer Part Number=CC1210_47UF_10V_10%_X7R, Mounted=Yes, Part Description="SMD Multilayer Chip Ceramic Capacitor", Part Number=CC1210_47UF_10V_10%_X7R, Pin Count=2, Sense=No, SMD=Yes, Socket=No, Status=None, TC=X7R
C307: library part CC0402_100NF_16V_10%_X5R, "Non-polarised capacitor", Case=0402, Manufacturer=GENERIC, Manufacturer1 ComponentHeight=0.55mm, Manufacturer1 Example=MURATA, Manufacturer1 Part Number=GRM155R61C104KA88D, Tolerance=±10%, Voltage=16V, Author="CERN DEM JLC", Component Type=Standard, CreateDate=2013-12-10, HelpURL=\\cern.ch\dfs\Applications\Altium\Datasheets\CC0402_X5R_MURATA_GRM.pdf, LatestRevisionDate=2013-12-10, Manufacturer Part Number=CC0402_100NF_16V_10%_X5R, Mounted=Yes, Part Description="SMD Multilayer Chip Ceramic Capacitor", Part Number=CC0402_100NF_16V_10%_X5R, Pin Count=2, Sense=No, SMD=Yes, Socket=No, Status=None, TC=X5R
C328 C329 C330 C331 C347 C348 C349 C350: library part CC0201_22NF_6.3V_10%_X5R, "Non-polarised capacitor", Case=0201, Manufacturer=GENERIC, Manufacturer1 ComponentHeight=0.33mm, Manufacturer1 Example=AVX, Manufacturer1 Part Number=02016D223KAT2A, Tolerance=±10%, Voltage=6.3V, Author="CERN DEM JLC", Component Type=Standard, CreateDate=2007-12-03, HelpURL=\\cern.ch\dfs\Applications\Altium\Datasheets\CC0201_X5R_AVX.pdf, LatestRevisionDate=2007-12-03, Manufacturer Part Number=CC0201_22NF_6.3V_10%_X5R, Mounted=Yes, Part Description="SMD Multilayer Chip Ceramic Capacitor", Part Number=CC0201_22NF_6.3V_10%_X5R, Pin Count=2, SMD=Yes, Socket=No, Status="Not Recommended", Table="Capacitors SMD", TC=X5R
C396: library part CC0402_27PF_50V_5%_C0G, "Non-polarised capacitor", Case=0402, Manufacturer=GENERIC, Manufacturer1 ComponentHeight=0.55mm, Manufacturer1 Example=KEMET, Manufacturer1 Part Number=C0402C270J5GACTU, Tolerance=±5%, Voltage=50V, Author="CERN DEM JLC", Component Type=Standard, CreateDate=25/10/2012, HelpURL="\\cern.ch\dfs\Applications\Altium\Datasheets\CC0402_C0G_KEMET_(Commercial Grade).pdf", LatestRevisionDate=22/04/2015, Manufacturer Part Number=CC0402_27PF_50V_5%_C0G, Mounted=Yes, Part Description="SMD Multilayer Chip Ceramic Capacitor", Part Number=CC0402_27PF_50V_5%_C0G, Pin Count=2, Sense=No, SMD=Yes, Socket=No, Status=Preferred, TC=C0G/NP0
C398: library part CC1206_10UF_25V_10%_X7R, "Non-polarised capacitor", Case=1206, Manufacturer=GENERIC, Manufacturer1 ComponentHeight=1.8mm, Manufacturer1 Example=KEMET, Manufacturer1 Part Number=C1206C106K4RACTU, Tolerance=±10%, Voltage=25V, Author="CERN DEM JLC", Component Type=Standard, CreateDate=12/09/2012, HelpURL=\\cern.ch\dfs\Applications\Altium\Datasheets\CC1206_X7R_KEMET.pdf, LatestRevisionDate=12/09/2012, Manufacturer Part Number=CC1206_10UF_25V_10%_X7R, Mounted=Yes, Part Description="SMD Multilayer Chip Ceramic Capacitor", Part Number=CC1206_10UF_25V_10%_X7R, Pin Count=2, Sense=No, SMD=Yes, Socket=No, Status=Preferred, TC=X7R
D1 D3 D4 D5 D6 D7 D8 D15: library part CMP-004-00037-2, "Diode TVS Quint Common Anode Uni-Dir 3.3V 40W 6-Pin SLP EP T/R", Max Operating Temperature=125°C, Min Operating Temperature=-55°C, Mounting Technology="Surface Mount", Pins=6
D2: library part CMP-004-00042-2, "ESD Suppressors / TVS Diodes High Speed Interface Protection Low Cap", Case/Package=SOT-666, Forward Voltage=1.1V, Max Operating Temperature=125°C, Min Operating Temperature=-40°C, Mounting Technology="Surface Mount", Pins=6
D10: library part BAV99W-7-F, "Serial Diode", Case=SOT323, Manufacturer="DIODES INCORPORATED", Power=200mW, Voltage=75V, Author="CERN DEM MR", Bonding=No, Component Type=Standard, ComponentHeight=1.10mm, CreateDate=10.02.2016, Device=BAV99W, HelpURL=\\cern.ch\dfs\Applications\Altium\Datasheets\BAV99W.pdf, LatestRevisionDate=10.02.2016, Manufacturer Part Number=BAV99W, Mounted=Yes, PackageDescription="SOT323, 0.65mm Pitch; 3 Pin, 1.25mm W X 2.00mm L X 1.10mm H body, IPC Medium Density", Part Description="Dual Surface Mount Switching Diode", Part Number=BAV99W-7-F, Pin Count=3, PressFit=No, Sense=No, SMD=Yes, Socket=No
D17 D18: "Schottky Diode", Case=SOD323, Manufacturer=INFINEON, Power=750mA, Voltage=40V, Author="CERN DEM JLC", Bonding=No, ComponentHeight=1.1mm, Component Type=Standard, CreateDate=12.11.2014, Device=BAT165, HelpURL=\\cern.ch\dfs\Applications\Altium\Datasheets\BAT165.pdf, LatestRevisionDate=12.11.2014, Manufacturer Part Number=BAT165, Mounted=Yes, PackageDescription="Small Outline Diode (SOD-323), 1.70mm W X 1.25mm L X 1.10mm H body,  IPC Medium Density", Part Description="Medium Power AF Schottky Diode", Part Number=BAT165, Pin Count=2, PressFit=No, Sense=No, SMD=Yes, Socket=No
F1 F4: library part FUSR_BOURNS_MF-MSMF110/16-2, "Fuse", Manufacturer=BOURNS, Manufacturer Part Number=MF-MSMF110/16, Author="CERN DEM JLC", Component Type=Standard, ComponentHeight=0.85mm, CreateDate=02.03.2011, Family="Fuses Resettable", HelpURL=\\cern.ch\dfs\Applications\Altium\Datasheets\FUSR_BOURNS_MF-MSMF.pdf, LatestRevisionDate=20.06.2023, Mounted=Yes, PackageDescription="PTC Resettable Fuse, MF-MSMS Series, Case Style 1 Height 0.85mm", Part Description="PTC Resettable Fuse", Part Number=FUSR_BOURNS_MF-MSMF110/16-2, Pin Count=2, PressFit=No, Sense=No, SMD=Yes, Socket=No
F3: library part FUSR_BOURNS_MF-MSMF250/16X-2, "Fuse", Manufacturer=BOURNS, Manufacturer Part Number=MF-MSMF250/16X, Author="CERN DEM JLC", Component Type=Standard, ComponentHeight=1.6mm, CreateDate=02.03.2011, Family="Fuses Resettable", HelpURL=\\cern.ch\dfs\Applications\Altium\Datasheets\FUSR_BOURNS_MF-MSMF.pdf, LatestRevisionDate=20.06.2023, Mounted=Yes, PackageDescription="PTC Resettable Fuse, MF-MSMS Series, Case Style 2", Part Description="PTC Resettable Fuse", Part Number=FUSR_BOURNS_MF-MSMF250/16X-2, Pin Count=2, PressFit=No, Sense=No, SMD=Yes, Socket=No
FB1 FB2 FB3 FB4: library part IND1806_MURATA_BLM41PG600SN1L, Case=1806, Manufacturer=MURATA, Manufacturer Part Number=BLM41PG600SN1L, Power=6A, Resistance=0.01R, Author="CERN DEM JLC", Component Type=Standard, ComponentHeight=1.8mm, CreateDate=02.12.2009, HelpURL=\\cern.ch\dfs\Applications\Altium\Datasheets\IND1806_MURATA_BLM41P.pdf, LatestRevisionDate=02.12.2009, Mounted=Yes, Part Description="SMD EMI Suppression Chip Ferrite Bead (BLM41P Series)", Part Number=IND1806_MURATA_BLM41PG600SN1L, Pin Count=2, Sense=No, SMD=Yes, Socket=No, Status=None
FTG1 FTG2 FTG3 FTG4 FTG5 FTG6: library part FIDUCIAL_TARGET_S100-200, "Fiducial Target", Author="CERN DEM JLC", Component Type="Standard (No BOM)", ComponentHeight=0mm, CreateDate=09.02.2010, Family=Fiducial, HelpURL=Undefined, LatestRevisionDate=04.04.2012, Mounted=No, PackageDescription="Square Fiducial Target, Top Layer, 1.0mm, Top Solder 2.0mm, Keepout =2.0mm", Part Description="Square Fiducial Target, Top Layer, 1.0mm, Top Solder 2.0mm, Keepout =2.0mm", Part Number=FIDUCIAL_TARGET_S100-200, Pin Count=1, Sense=No, SMD=Yes, Socket=No, Status=None
HS1: library part HSINK_ATS_ATS-50350B-C1-R0, "Heat Sink Without Pad", Manufacturer="ADVANCED THERMAL SOLUTIONS (ATS)", Manufacturer Part Number=ATS-50350B-C1-R0, Author="CERN DEM JLC", Component Type=Standard, ComponentHeight=7.5mm, CreateDate=30.11.2016, HelpURL=\\cern.ch\dfs\Applications\Altium\Datasheets\HSINK_ATS_ATS-50350B-C1-R0.pdf, LatestRevisionDate=30.11.2016, Mounted=Yes, PackageDescription="35.0 x 35.0 x 7.5 mm BGA Heat Sink, Body 49.9mm x 35mm  Height 7.5mm", Part Description="35.0 x 35.0 x 7.5 mm BGA Heat Sink, High Performance maxiFLOW/maxiGRIP-STD", Part Number=HSINK_ATS_ATS-50350B-C1-R0, Pin Count=0, PressFit=No, Sense=No, SMD=No, Socket=No, Status=None
IC1 IC33: "2 Input/10 Output, Low Jitter Universal Buffer/Level Translator With 2:1 Input Mux (<1.25 GHZ)", Case=QFN44, Manufacturer="SILICON LABS", Author="CERN DEM MR", Bonding=No, Component Type=Standard, ComponentHeight=0.9mm, CreateDate=02.10.2017, Device=SI53312-B-GM, HelpURL=\\cern.ch\dfs\Applications\Altium\Datasheets\SI53312-B-GM.pdf, LatestRevisionDate=02.10.2017, Manufacturer Part Number=SI53312-B-GM, Mounted=Yes, PackageDescription="QFN, 0.50mm Pitch, Square; 44 Pin, 7.00mm L X 7.00mm W X 0.90mm H body (w/Thermal Tab 2.95 X 2.95mm), IPC Medium Density", Part Description="2 Input/10 Output, Low Jitter Universal Buffer/Level Translator With 2:1 Input Mux (<1.25 GHZ)", Part Number=SI53312-B-GM, Pin Count=45, PressFit=No, Sense=No, SMD=Yes, Socket=No
IC2: "Any Frequency Precision Clock Multiplier/Jitter Attenuator", Case=QFN36, Manufacturer="SILICON LABS", Author="CERN DEM JLC", Bonding=No, ComponentHeight=0.9mm, Component Type=Standard, CreateDate=19.08.2013, Device=Si5324C-C-GM, HelpURL=\\cern.ch\dfs\Applications\Altium\Datasheets\Si5324C-C-GM.pdf, LatestRevisionDate=19.08.2013, Manufacturer Part Number=Si5324C-C-GM, Mounted=Yes, PackageDescription="QFN, 0.50mm Pitch, Square; 36 Pin, 6.00mm L X 6.00mm W X 0.90mm H Body (w/thermal tab 4.25m x 4.25mm), IPC Medium Density", Part Description="Any Frequency Precision Clock Multiplier/Jitter Attenuator", Part Number=Si5324C-C-GM, Pin Count=37, PressFit=No, Sense=No, SMD=Yes, Socket=No
IC3 IC10 IC11: "20V, 500mA, Ultralow Noise, Ultrahigh PSRR Linear Regulator", Case=SON10, Manufacturer="LINEAR TECHNOLOGY", Author="CERN DEM JLC", Bonding=No, ComponentHeight=0.8mm, Component Type=Standard, CreateDate=07.12.2016, Device=LT3045EDD#PBF, HelpURL=\\cern.ch\dfs\Applications\Altium\Datasheets\LT3045EDD#PBF.pdf, LatestRevisionDate=07.12.2016, Manufacturer Part Number=LT3045EDD#PBF, Mounted=Yes, PackageDescription="SON, 0.50mm Pitch, 10-pin, 3.00mm W  X 3.00mm L X 0.80mm Height, (w/thermal tab 1.75 X 2.48 mm), IPC Medium Density", Part Description="20V, 500mA, Ultralow Noise, Ultrahigh PSRR Linear Regulator", Part Number=LT3045EDD#PBF, Pin Count=11, PressFit=No, Sense=No, SMD=Yes, Socket=No
IC4: "Artix-7 FPGA, 500 User I/Os, 16 GTP, 1156-Ball BGA, , Speed Grade 3, Commercial Grade, Pb-Free", Case=BGA1156, Manufacturer=XILINX, Author="CERN DEM JLC", Bonding=No, Component Type=Standard, ComponentHeight=3.1mm, ComponentLink1Description=Package, ComponentLink1URL=\\cern.ch\dfs\Applications\Altium\Datasheets\XC7A200T-3FFG1156C_Package.pdf, ComponentLink2Description=Pinout, ComponentLink2URL=\\cern.ch\dfs\Applications\Altium\Datasheets\XC7A200T-3FFG1156C_Pinout.txt, CreateDate=07.11.2016, Device=XC7A200T-3FFG1156C, HelpURL=\\cern.ch\dfs\Applications\Altium\Datasheets\XC7A200T-3FFG1156C.pdf, LatestRevisionDate=07.11.2016, Manufacturer Part Number=XC7A200T-3FFG1156C, Mounted=Yes, PackageDescription="BGA, 1.00mm Pitch, Square; 1156 Pin, 34 Columns X 34 Rows, Body 35.00mm X 35.0mm X 3.10mm H, IPC Medium Density", Part Description="Artix-7 FPGA, 500 User I/Os, 16 GTP, 1156-Ball BGA, Speed Grade 3, Commercial Grade, Pb-Free", Part Number=XC7A200T-3FFG1156C, Pin Count=1156, PressFit=No, Sense=No, SMD=Yes, Socket=No
IC6 IC14 IC23: library part MPM54304GMN-XXXX, "Quad-Output Power Module with I2C and MTP", Case=QFN32, Manufacturer="MPS (MONOLITIC  POWER SYSTEMS)", Manufacturer Part Number=MPM54304GMN-002, Author="CERN DEM BC", Bonding=No, Component Type=Standard, ComponentHeight=2.1mm, CreateDate=09.11.2020, Device=MPM54304GMN-0002, HelpURL=\\cern.ch\dfs\Applications\Altium\Datasheets\MPM54304GMN.pdf, LatestRevisionDate=23.11.2022, Mounted=Yes, PackageDescription="MPS LGA-33 Case, 0.65mm Pitch, Rect.; 32 Pin, 7.00mm L X 7.00mm W X 2.10mm H body (w/Thermal Tab 3.55 X 3.55mm)", Part Description="4V to 16V Input, Quad-Output Power Module with I2C and MTP", Part Number=MPM54304GMN-0002, Pin Count=33, PressFit=No, Sense=No, SMD=Yes, Socket=No
IC8 IC36: "32 Meg x 16 x 8 Banks DDR3L SDRAM", Case=BGA96, Manufacturer="MICRON TECHNOLOGY", Author="CERN DEM MR", Bonding=No, ComponentHeight=1.2mm, Component Type=Standard, CreateDate=2015-12-14, Device=MT41K256M16TW-107:P, HelpURL=\\cern.ch\dfs\Applications\Altium\Datasheets\MT41K256M16TW-107-P.pdf, LatestRevisionDate=2015-12-14, Manufacturer Part Number=MT41K256M16TW-107:P, Mounted=Yes, PackageDescription="BGA 0.8mm, Pitch, Square 96 Pin, 9 Columns x 16 Rows, Body 14mm X 8mm X 1.2mm H", Part Description="+1.5V, 4Gb (32Meg x 16 x 8 banks) DDR3L SDRAM", Part Number=MT41K256M16TW-107:P, Pin Count=96, PressFit=No, Sense=No, SMD=Yes, Socket=No
IC9: "Sink/Source DDR Termination Regulator", Case=SON10, Manufacturer="TEXAS INSTRUMENTS", Author="CERN DEM JLC", Bonding=No, ComponentHeight=1mm, Component Type=Standard, CreateDate=03.02.2010, Device=TPS51200DRCT, HelpURL=\\cern.ch\dfs\Applications\Altium\Datasheets\TPS51200DRCT.pdf, LatestRevisionDate=06.11.2013, Manufacturer Part Number=TPS51200DRCT, Mounted=Yes, PackageDescription="SON, 0.50mm Pitch, 10-pin, 3.00mm W  X 3.00mm L X 1.00mm Height, (w/thermal tab 1.75 X 2.50 mm)", Part Description="3.3V Sink/Source DDR Termination Regulator", Part Number=TPS51200DRCT, Pin Count=11, PressFit=No, Sense=No, SMD=Yes, Socket=No
IC12 IC17 IC19 IC20: "Dual-Bit Dual-Supply Bus Transceiver With Configurable Voltage Translation and 3-State Outputs", Case=QFN10, Manufacturer="TEXAS INSTRUMENTS", Author="CERN DEM JLC", Bonding=No, ComponentHeight=0.55mm, Component Type=Standard, CreateDate=07.07.2014, Device=SN74AVC2T245RSWR, HelpURL=\\cern.ch\dfs\Applications\Altium\Datasheets\SN74AVC2T245RSWR.pdf, LatestRevisionDate=30.03.2017, Manufacturer Part Number=SN74AVC2T245RSWR, Mounted=Yes, PackageDescription="QFN, 0.40mm Pitch, Rect.;10 Pin, 1.80mm L X 1.40mm W X 0.55mm H Body, IPC Medium Density", Part Description="Dual-Bit Dual-Supply Bus Transceiver With Configurable Voltage Translation and 3-State Outputs", Part Number=SN74AVC2T245RSWR, Pin Count=10, PressFit=No, Sense=No, SMD=Yes, Socket=No, Status="Not Recommended"
IC15: "Low Voltage 8-Channel I2C Switch With Reset", Case=QFN24, Manufacturer="TEXAS INSTRUMENTS", Author="CERN DEM JLC", Bonding=No, ComponentHeight=1mm, Component Type=Standard, CreateDate=07.07.2014, Device=TCA9548ARGER, HelpURL=\\cern.ch\dfs\Applications\Altium\Datasheets\TCA9548ARGER.pdf, LatestRevisionDate=07.07.2014, Manufacturer Part Number=TCA9548ARGER, Mounted=Yes, PackageDescription="QFN, 0.50mm Pitch, Square; 24 Pin, 4.00mm L X 4.00mm W X 1.00mm H body (w/thermal tab 2.2 X 2.2mm), IPC Medium Density", Part Description="Low Voltage 8-Channel I2C Switch With Reset", Part Number=TCA9548ARGER, Pin Count=25, PressFit=No, Sense=No, SMD=Yes, Socket=No
IC16: "128Mbit, MirrorBit® Flash Non-Volatile Memory CMOS 3.0 Volt Core with Versatile I/O Serial Peripheral Interface with Multi-I/O", Case=SOIC16, Manufacturer=SPANSION, Author="CERN DEM JLC", Bonding=No, ComponentHeight=2.65mm, Component Type=Standard, CreateDate=2014-07-10, Device=S25FL128SAGMFIR01, HelpURL=\\cern.ch\dfs\Applications\Altium\Datasheets\S25FL128SAGMFIR01.pdf, LatestRevisionDate=2014-07-10, Manufacturer Part Number=S25FL128SAGMFIR01, Mounted=Yes, PackageDescription="SOIC 16, Pitch 1.27mm - Body 7.5x10.3mm, IPC Medium Density", Part Description="128Mbit, 133MHz, MirrorBit® Flash Non-Volatile Memory CMOS 3V Core with Versatile I/O Serial Peripheral Interface with Multi-I/O", Part Number=S25FL128SAGMFIR01, Pin Count=11, PressFit=No, Sense=No, SMD=Yes, Socket=No
IC18: "Quad High Speed USB to Multipurpose UART/MPSSE IC", Case=QFN56, Manufacturer="FUTURE TECHNOLOGY DEVICES INTERNATIONAL (FTDI)", Author="CERN DEM JLC", Bonding=No, ComponentHeight=1mm, Component Type=Standard, CreateDate=11.10.2016, Device=FT4232H-56Q, HelpURL=\\cern.ch\dfs\Applications\Altium\Datasheets\FT4232H-56Q.pdf, LatestRevisionDate=11.10.2016, Manufacturer Part Number=FT4232H-56Q, Mounted=Yes, PackageDescription="QFN, 0.50mm Pitch, Square; 56 Pin, 8.00mm L X 8.00mm W X 1.00mm H body (6.1mm X 6.1mm Thermal tab), IPC Medium Density", Part Description="Quad High Speed USB to Multipurpose UART/MPSSE IC", Part Number=FT4232H-56Q, Pin Count=57, PressFit=No, Sense=No, SMD=Yes, Socket=No
IC21: "2K Microwire Compatible Serial EEPROM", Case=SOT23-6, Manufacturer="MICROCHIP TECHNOLOGY", Author="CERN DEM BC", Bonding=No, Component Type=Standard, ComponentHeight=1.45mm, CreateDate=06.04.2018, Device=93LC56B-I/OT, HelpURL=\\cern.ch\dfs\Applications\Altium\Datasheets\93LC56B-IOT.pdf, LatestRevisionDate=06.04.2018, Manufacturer Part Number=93LC56B-I/OT, Mounted=Yes, PackageDescription="SOT, 0.95mm Pitch; 6 Pin,1.55mm W X 2.90mm L X 1.45mm H body, IPC Medium Density", Part Description="2K, 128X16-bit, 2.5V Microwire Compatible Serial EEPROM", Part Number=93LC56B-I/OT, Pin Count=6, PressFit=No, Sense=No, SMD=Yes, Socket=No